# Altium PCB OFP_MCM_v1.62.PcbDoc (part 8 of 8)
Units mil, origin at the board's own origin, x right, y up, seen from the top; angles counter-clockwise.
Board outline 4330.71 x 4724.41 mil, 4 copper layers (Top Layer, Layer 1, Layer 2, Bottom Layer), stack 62.047 mil thick; 385 components, 287 nets, 1341 pads, 554 vias.
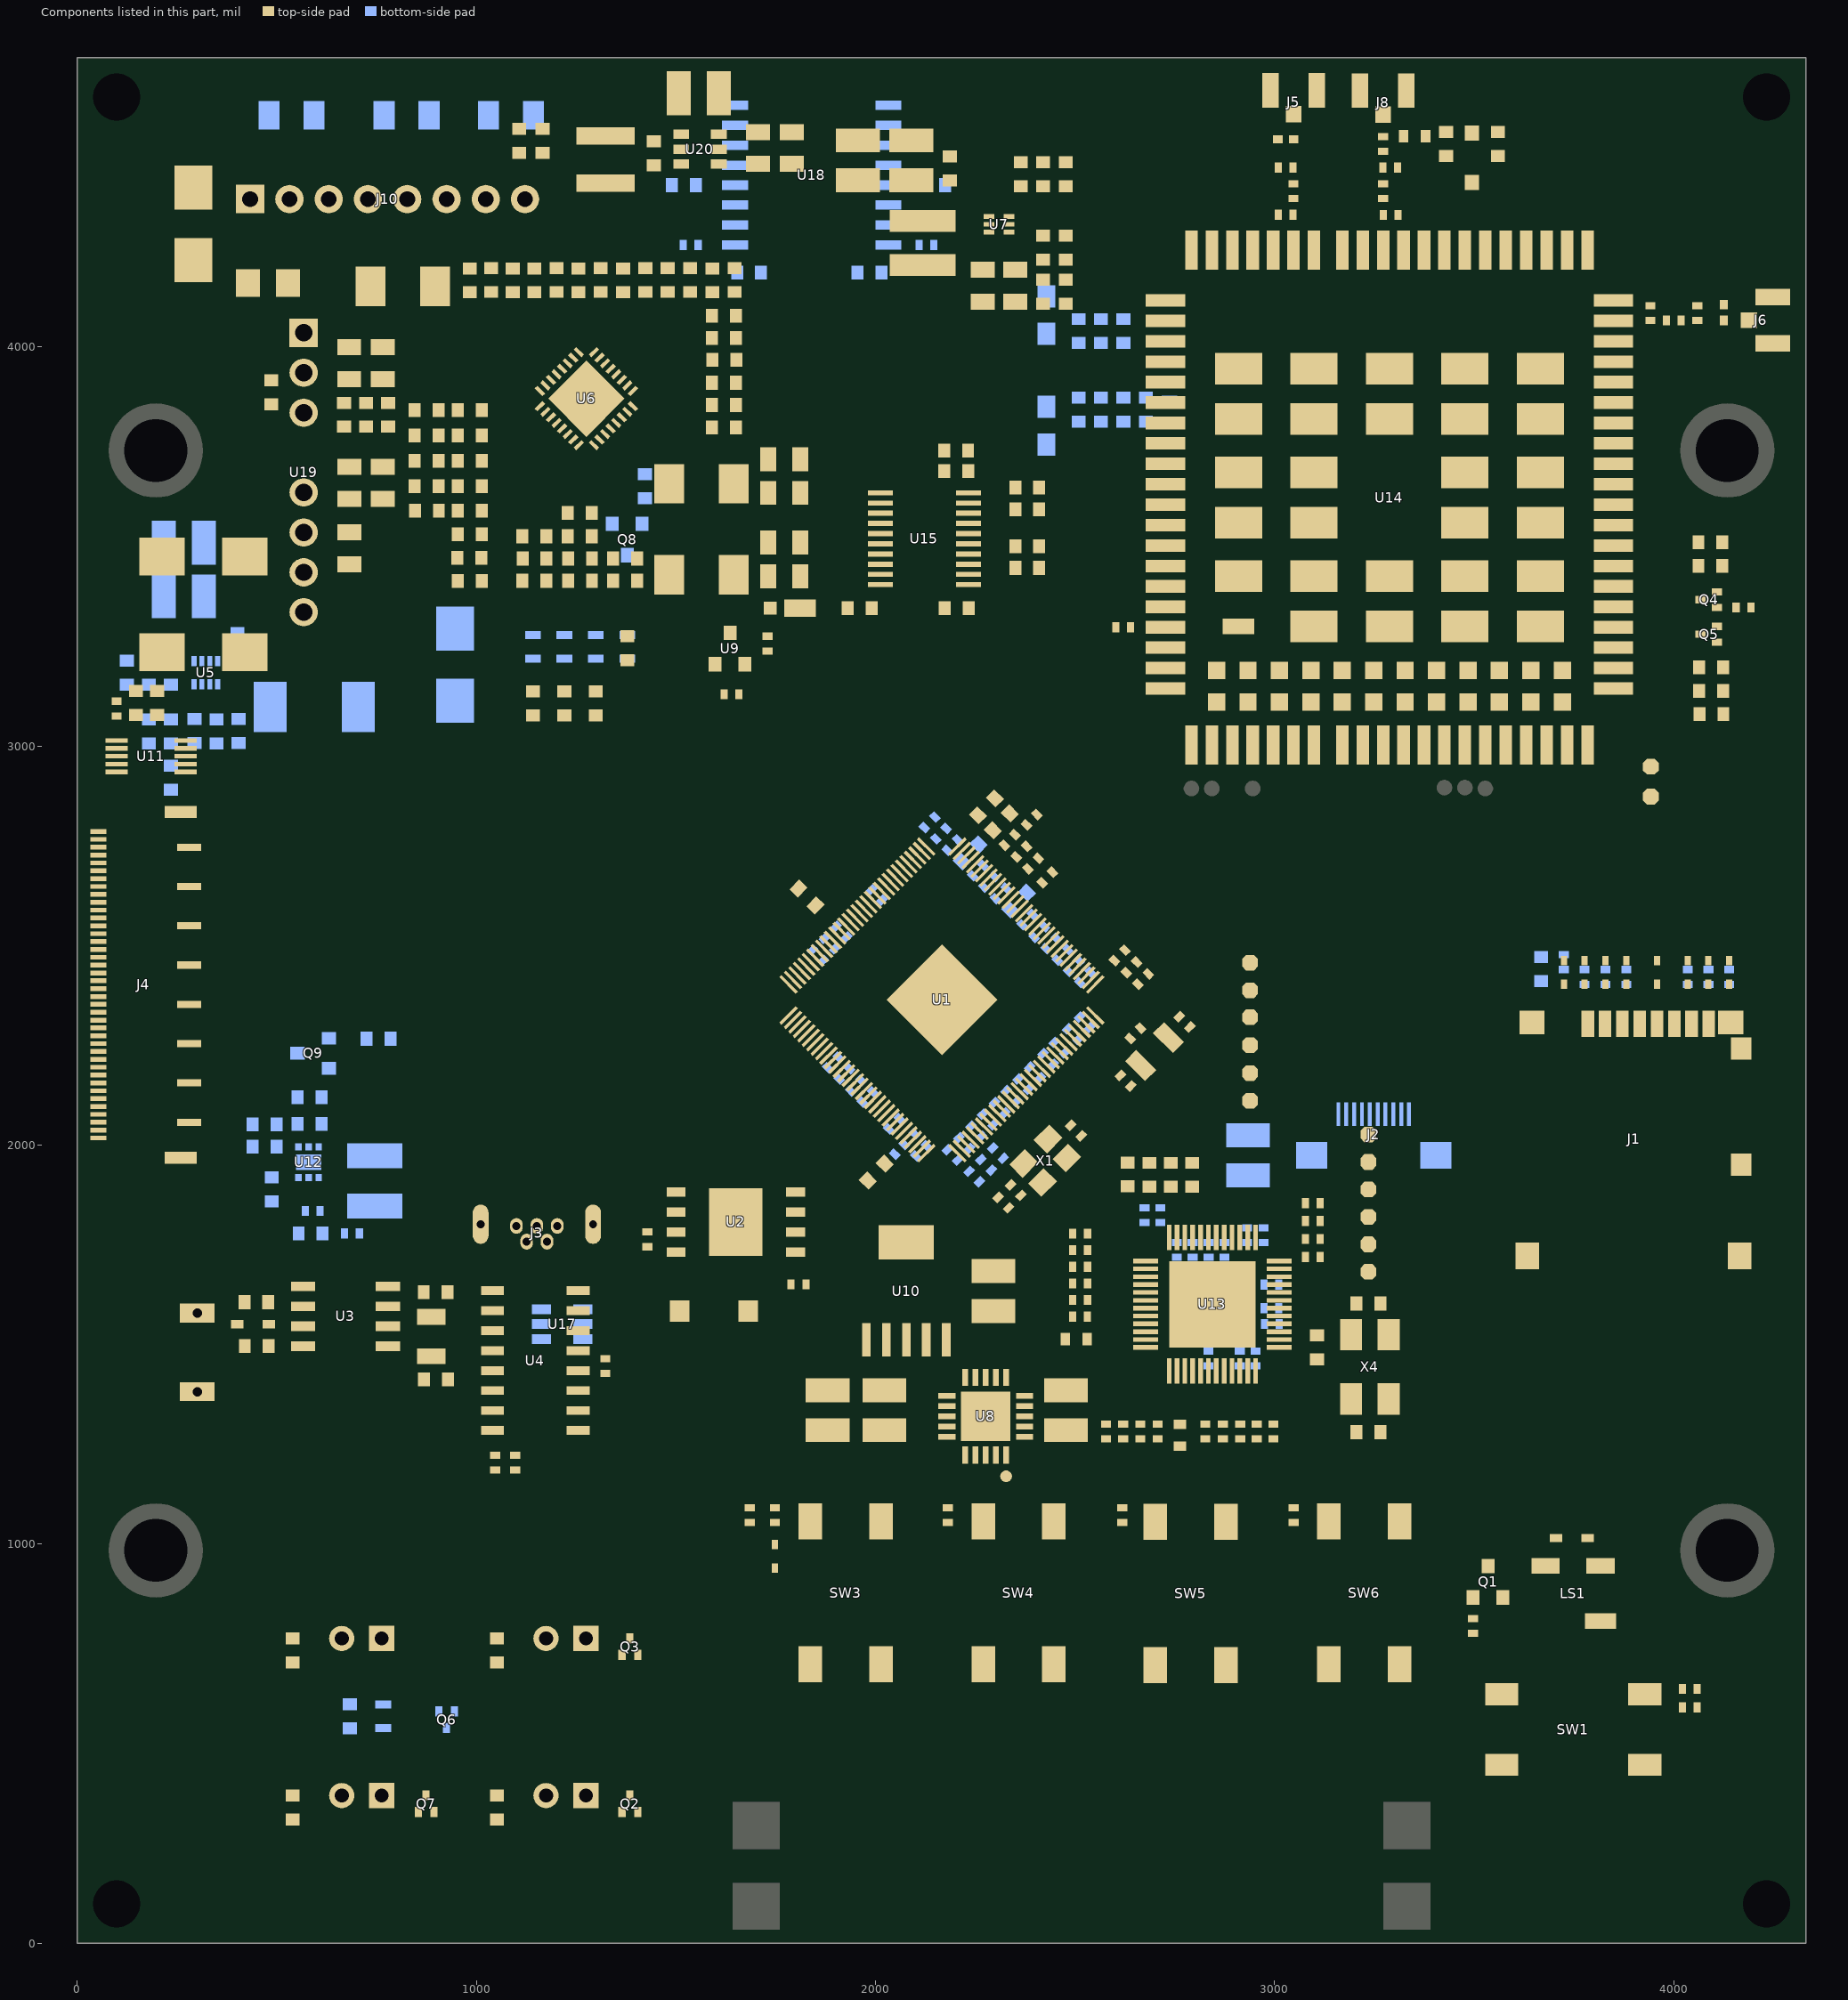
[diagram p7: the components of this part, seen from the top]

## Polygon pours and split planes (outlines as drawn)
+3.8V on Top Layer "NONET_L-01_P-001" (solid, pour order 37): 2218.63,4153.04 2232.95,4138.72 2501.88,4138.72 2515.99,4124.61 2515.99,4043.19 2529.66,4029.53 2783.22,4029.53 2798.91,4013.84 2798.91,3860.24 2783.16,3844.49 2035.39,3844.49 2035.39,4232.53 2218.63,4232.53
GND on Top Layer "NONET_L-01_P-001" (solid, remove dead copper, pour order 45): 0,4724.41 4330.71,4724.41 4330.71,0 0,0 0,4724.41
VCC-DRAM on Top Layer "NONET_L-01_P-001" (solid, pour order 19): 2245.47,2214.59 2287.25,2214.59 2355.62,2146.22 2384.67,2117.17 2301.15,2033.65 2259.39,2075.41 2225.67,2075.41 ccw(c2225.67,1975.41) 2154.96,2046.12 2031.98,1923.14 1993,1962.12
+5V on Top Layer "NONET_L-01_P-001" (solid, pour order 4): 1322.1,3800.51 1397.95,3724.66 1401.53,3724.66 1408.89,3732.02 1408.89,3761.27 1345.88,3824.28
GND on Layer 1 "NONET_L-01_P-001" (solid, pour order 36): 0,4724.41 4330.71,4724.41 4330.71,0 0,0 0,4724.41
+3.3V on Layer 2 "NONET_L-01_P-001" (solid, pour order 32): 1010,259.07 ccw(c1049.06,259.06) 1049.07,220 ccw(c1049.07,259.07) 1088.14,259.07 1088.14,1034.24 3489.29,1034.24 3613,1156.79 3613,2688.65 4310.95,2688.65 4310.95,0 0,0 0,3625.64 2304.54,3625.63 2342.01,3588.16 2342.01,3254.89 2300.12,3213 1520,3213 1490,3183 1490,1992.69 1580.69,1902 1861.8,1902 1873,1890.8 1873,1803.19 1862.61,1792.8 1492.2,1792.8 1341.66,1943.34 1341.66,3061.36 1306.91,3096.12 1136.08,3096.11 1094.99,3055.02 1094.99,2505.21 724.31,2134.53 724.31,1303.1 1010,1017.41
+5V on Layer 2 "NONET_L-01_P-001" (solid, pour order 13): 3227.39,1957.39 3244.27,1957.39 3285,1916.67 3285,1230 3250,1195 2045,1195 2016.17,1223.83 2016.17,1540.47 1991.64,1565 1790,1565 1770,1545 1770,1070.25 3465.25,1070.25 3570.5,1175.5 3570.5,2688.65 2775.59,3483.56 2775.59,4710 15,4710 15,3652.92 450.26,3652.92 565.49,3768.14 565.49,4255.88 551.36,4270 385,4270 360,4295 360,4409.61 385.39,4435 2315,4435 2370,4380 2370,2953.77 2810,2513.77 2810,1986.54 2839.15,1957.39
GND on Layer 2 "NONET_L-01_P-001" (solid, pour order 52): 2115.81,3034.73 cw(c2115.81,3012.22) 2138.32,3012.22 2138.32,2807.44 1933.7,2602.82 1902.18,2602.82 1852.52,2652.49 1811.14,2652.49 1666,2507.35 1666,2358.77 1904.57,2120.21 1864.6,2080.23 1974.29,1970.54 2010.75,1970.54 2024.78,1956.51 2024.78,1889.22 2052.95,1861.05 2343.18,1861.05 2411.68,1929.55 2499.45,1929.55 2516,1913 2515.72,1912.72 2515.72,1377.72 2494.67,1356.67 2367.62,1356.67 2351.69,1340.74 2351.69,1244.6 2327.09,1220 2063.85,1220 2041.41,1242.44 2041.41,1563.59 2012,1593 1777.15,1593 1734,1549.85 1734,1140 1125,1140 891.05,1373.95 891.05,2061.45 1173.59,2344 1251,2344 1251,1920.12 1456.1,1715.02 2303.84,1715.02 ccw(c2303.85,1746.96) 2335.79,1746.97 2335.79,1756.64 ccw(c2299.65,1756.65) 2299.64,1792.8 1905.59,1792.8 1893.7,1804.69 1893.7,1895.39 1863.88,1925.2 1609.61,1925.2 1524.32,2010.5 1524.32,3014.05 1545,3034.73
VCC-IO on Layer 2 "NONET_L-01_P-001" (solid, pour order 43): 2293.24,2499.71 2375.57,2582.04 2392.54,2582.04 2515.08,2459.5 2515.08,2444.01 2199.22,2128.15 2199.22,2027.05 2160.18,1988.01 1982.75,1988.01 1896.04,2074.72 1896.04,2082.3 1920.62,2106.88 1927.93,2106.88 1998.3,2036.5 2138.32,2036.5 2151.31,2049.49 2151.31,2162.51 2446.48,2457.67 2446.48,2471.74 2415.3,2502.92 2392.03,2502.92 2267.3,2378.19 2244.56,2378.19 2007.25,2615.51 2007.25,2646.73 2198.89,2838.38 2204.11,2838.38 2260.08,2782.41 2260.08,2768.58 2138.32,2646.83 2138.32,2633.2 2271.81,2499.71
GND on Layer 2 "NONET_L-01_P-001" (solid, pour order 50): 4330.71,4724.41 2822,4724.41 2822,3496.84 3594.62,2724.22 4330.71,2724.22
GND on Layer 2 "NONET_L-01_P-001" (solid, pour order 51): 2342.01,3688.31 2306.62,3652.92 1504.71,3652.92 1478.43,3679.2 1478.43,4304.57 1448.35,4334.65 1086.77,4334.65 1086.77,4409 2297,4409 2342.01,4363.99
+1.2V on Layer 2 "NONET_L-01_P-001" (solid, pour order 49): 659.04,4273.91 685.13,4300 1425.74,4300 1449.43,4276.3 1449.43,4042.61 1425.77,4018.95 685.31,4018.95 659.04,4045.22
VDD-SYS on Layer 2 "NONET_L-01_P-001" (solid, pour order 48): 2057.6,1970 2045.4,1957.8 2045.4,1892.93 2058.33,1880 2331.01,1880 2355.94,1904.93 2355.94,2081.61 2445.34,2171 2445.34,2188.8 2370.71,2263.42 2355.97,2263.42 2215.92,2123.37 2215.92,2020.11 2165.81,1970
AVCC on Layer 2 "NONET_L-01_P-001" (solid, pour order 47): 2476.19,2161.19 2476.19,2181.64 2388.67,2269.15 2388.67,2285.39 2530.5,2427.23 2530.5,2466 2490.56,2505.94 2398.5,2598 2369.92,2598 2286.93,2515 2278.14,2515 2263.17,2529.97 2263.17,2538.16 2392.21,2667.2 2417.8,2667.2 2635.95,2449.05 2635.95,2353.47 2635.95,2098.09 2487.01,1949.14 2458.07,1949.14 2371.44,2035.77 2371.44,2056.44
VDD-SYS on Layer 2 "NONET_L-01_P-001" (solid, pour order 44): 1816.08,2455.57 1965.89,2605.37 1993.28,2605.37 2232.81,2365.84 2277.8,2365.84 2398.34,2486.38 2410.12,2486.38 2427.38,2469.13 2427.38,2460.86 2135.55,2169.03 2135.55,2086.71 2129.98,2081.14 2106.88,2081.14 2101.44,2086.58 2101.44,2142.85 1816.08,2428.21
VCC-HP on Layer 2 "NONET_L-01_P-001" (solid, pour order 46): 2651.57,2367.26 2651.57,2116.01 2670.8,2096.78 2752.88,2096.78 2772.64,2116.54 2772.64,2496.16 2454.44,2814.36 2420.66,2814.36 2209.28,2602.98 2209.28,2583.65 2238.18,2554.75 2257.14,2554.75 2385.9,2683.51 2423.36,2683.51 2651.57,2455.3
VDD-CPU on Layer 2 "NONET_L-01_P-001" (solid, pour order 42): 1842.95,2636.37 1900,2579.33 1900,2563.7 1799.22,2462.92 1799.22,2420.26 2040,2179.48 2040,2159.28 1976.98,2096.25 1961.29,2096.25 1687.5,2370.05 1687.5,2500.71 1823.16,2636.37
+5V on Layer 2 "NONET_L-01_P-001" (solid, pour order 27): 420,4256.19 433.8,4270 551.36,4270 566.93,4254.44 566.93,4004.77 581.7,3990 1425.84,3990 1449.43,3966.4 1449.43,3677.39 1424.96,3652.92 450.26,3652.92 420,3683.18
VDD33 on Layer 2 "NONET_L-01_P-001" (solid, pour order 33): 2535,1913.8 2549.2,1928 3230.84,1928 3253.5,1905.33 3253.5,1253.5 3220,1220 2678.75,1220 2653,1245.75 2653,1408.08 2636.08,1425 2552.48,1425 2534.99,1442.49 2534.99,1515.76 2551.39,1532.16 2856.78,1532.16 2882.68,1506.26 2882.68,1318.48 2897.59,1303.58 2969.21,1303.58 2985.36,1319.73 2985.36,1459.91 3000.1,1474.65 3108.38,1474.65 3127.12,1493.39 3127.12,1692.2 3111.55,1707.78 3053.91,1707.78 3036.87,1724.82 3036.87,1784.62 3013.49,1808 2657.57,1808 2640.18,1790.61 2640.18,1738.91 2623.03,1721.76 2545.77,1721.76 2534.99,1732.53
VDD11 on Layer 2 "NONET_L-01_P-001" (solid, pour order 41): 2534.99,1693.71 2546.6,1705.97 2629.21,1705.97 2655.7,1732.46 2655.7,1784.22 2663.78,1792.31 3006.69,1792.31 3021.26,1777.74 3021.26,1710.96 3040.02,1692.2 3101.67,1692.2 3111.64,1682.24 3111.64,1499.54 3102.2,1490.11 2993.88,1490.11 2970.03,1466.26 2970.03,1326.53 2962.47,1318.97 2905.03,1318.97 2897.98,1326.02 2897.98,1512.77 2859.08,1551.67 2549.16,1551.67 2534.99,1565.84
NetL6_2 on Bottom Layer "NONET_L-01_P-001" (solid, pour order 38): 814.01,1937.92 624.77,1937.92 624.77,1986.77 597.51,1986.77 597.51,2016.92 814.01,2016.92
+3.3V on Bottom Layer "NONET_L-01_P-001" (solid, pour order 53): 1877.89,2208.85 1831.6,2162.56 ccw(c1893.61,2100.55) 1805.92,2100.55 1805.92,1646.08 ccw(c1837,1646.08) 1837,1615 1990.71,1615 ccw(c1990.71,1661.34) 2037.05,1661.34 2037.05,1948.55 ccw(c2015.05,1948.55) 2015.05,1970.54 1991.09,1970.54 ccw(c1991.09,1945.45) 1966,1945.45 1966,1872.31 cw(c1943.72,1872.31) 1943.72,1850.04 1878.1,1850.04 cw(c1878.1,1875.13) 1853,1875.14 1853,2077.83 cw(c1886.25,2077.84) 1862.74,2101.35 1924.06,2162.67
GND on Bottom Layer "NONET_L-01_P-001" (solid, remove dead copper, pour order 5): 0,4724.41 4330.71,4724.41 4330.71,0 0,0 0,4724.41
+5V on Bottom Layer "NONET_L-01_P-001" (solid, pour order 40): 2763.36,1988.36 2751,2000.72 2751,2122.69 2760.31,2132 3153.51,2132 3164.34,2121.17 3164.34,2037.64 3152.86,2026.16 3023.77,2026.16 2985.97,1988.36

## Other copper
Top Layer:
  rectangle net NetD20_1: 3689,925.79 3720.49,1025.59
  rectangle net +3.3V: 3767.74,925.79 3799.23,1025.59
  rectangle net GND: 32.95,2405.41 72.95,2437.1
  rectangle net GND: 32.95,2247.93 72.95,2279.62
  rectangle net GND: 32.95,2090.45 72.95,2122.14
  rectangle net 12V: 155.65,3427.62 477.09,3562.38
  rectangle net +5VUSB: 1011.53,1213.95 1117.99,1300.63
  region net +3.3V: 433.77,1540.7 433.77,1561.18 385.15,1561.18 385.15,1540.7
  rectangle net 3V3-I: 1576.91,4388.02 1832.26,4469.41
  rectangle net 3V3-I: 1653.35,4388.02 1832.26,4498
  rectangle net 3V3-I: 1250.61,4388.02 1820,4431.33
  rectangle net GND-IN: 1476.91,4520.59 1536.91,4690
  rectangle net NetC151_2: 1250.61,4483.19 1462.24,4549.44
  rectangle net NetC151_1: 1433.24,4440 1532.44,4470
  rectangle net NetC151_2: 1250.61,4483.19 1532.44,4506.81
  rectangle net 3V3-I: 1576.91,4445.79 1790,4469.41
  rectangle net VIN+: 1576.91,4483.19 1636.91,4635
  rectangle net GND: 1581.97,3116.79 1629.55,3222.88
  rectangle net VLED-: 32.95,1955 166.15,2023.72
  rectangle net GND: 1583.25,1630.52 1717.11,1891.74
  rectangle net GND: 2813.44,1255.08 2840.27,1273.08
  region net GND: 1328.76,3768.19 1335.72,3775.15 1281.67,3829.2 1274.71,3822.24
  region net GND: 1370.52,3809.95 1377.48,3816.91 1323.43,3870.96 1316.47,3864
  region net GND: 1349.64,3951.09 1342.68,3958.05 1288.63,3904 1295.59,3897.04
  region net GND: 1222.42,3971.97 1215.46,3965.01 1269.51,3910.96 1276.47,3917.92
  rectangle net NetR63_2: 2320.93,4320.52 2437.03,4416.94
  rectangle net 1.1V-HUB: 2422,1255.58 2532,1335.58
  rectangle net +3.3V: 1619.37,3265.4 1742.1,3301.62
  rectangle net +3.0V: 1648.55,3076.3 1689.05,3222.88
  rectangle net +3.8V: 2677.16,3844.49 2775.59,4029.53
  region net USB-D_N: 2408.33,2544.48 2448.7,2584.85 2443.14,2590.41 2402.77,2550.04
  region net USB-D_P: 2397.2,2555.61 2437.57,2595.98 2432,2601.55 2391.63,2561.18
  rectangle net 1.1V-HUB: 2319.92,1396.21 2394.49,1439
  rectangle net 1.1V-HUB: 2422,1255.58 2589.64,1273.08
  rectangle net 1.1V-HUB: 2351.69,1312.19 2532,1335.58
  rectangle net 1.1V-HUB: 2351.69,1313.26 2394.49,1439
  rectangle net +3.8V: 2035.39,4093.04 2493.76,4138.72
  rectangle net +3.8V: 2035.39,4093.04 2218.63,4232.53
  rectangle net NetR58_1: 2320.93,4263.09 2437.03,4292.96
  region net VCC-DRAM: 2326.68,2176.09 2320.07,2169.47 2378.52,2111.02 2385.14,2117.64
  region net VCC-DRAM: 2247.95,2098.92 2241.33,2092.3 2300.57,2033.07 2307.19,2039.69
  region net AGND: 2354.58,2623.4 2347.97,2630.01 2314.5,2596.55 2321.12,2589.93
  region net AGND: 2448.55,2665.06 2488.02,2704.53 2373.27,2819.28 2333.8,2779.81
  region net VDD-CPU: 1805.13,2507.41 1866.89,2445.65 1883.61,2462.37 1821.85,2524.13
  region net VDD-CPU: 1874.32,2549.57 1899.57,2574.81 1860.39,2613.99 1835.14,2588.74
  region net VDD-CPU: 1825.97,2597.92 1922.56,2501.32 1939.28,2518.04 1842.69,2614.63
  region net VCC-DRAM: 2031.98,1923.14 2128.57,2019.73 2089.59,2058.71 1993,1962.12
  region net VCC-DRAM: 2284.45,2016.95 2242.7,2058.71 2178.26,1994.27 2220.02,1952.52
  region net VCC-DRAM: 2277.47,2022.93 2264.78,2035.62 2181.97,1952.81 2194.66,1940.12
  rectangle net VDD11: 2813.44,1292.08 2840.27,1310.08
  rectangle net NetR110_2: 4048.54,3062.5 4079,3155.3
  rectangle net EC_RST: 4048.54,3179.35 4079.68,3310.43
  rectangle net EC_PWR: 4046.5,3335.51 4079.68,3527.6
  rectangle net VDD33: 2979.61,1703.41 3085.51,1715.22
  rectangle net +5V: 2260.42,4320.52 2307.17,4342.24
  region net +5V: 1345.88,3824.28 1322.1,3800.51 1383.98,3738.63 1407.76,3762.4
  region net NetC65_2: 1304.12,3782.52 1293.71,3772.12 1359.19,3706.64 1369.59,3717.04
  region net NetC72_2: 1373.71,3852.12 1363.31,3841.71 1428.72,3776.3 1439.13,3786.71
  region net NetC54_2: 1248.86,3959.44 1255.82,3966.4 1201.77,4020.45 1194.81,4013.49
  region net +3.3V: 83.4,3092.5 ccw(c83.4,3080) 70.9,3080 70.9,3007.66 203.4,3007.66 ccw(c203.4,3021.51) 217.24,3021.51 217.24,3092.5
  region net 12V: 567.18,3570.29 cw(c567.18,3534.86) 602.62,3534.86 cw(c567.18,3534.86) 567.18,3499.43 155.65,3499.43 155.65,3570.29
  region net VIN+: 566.93,4405.51 566.93,4285.56 cw(c551.36,4285.56) 551.36,4270 468.5,4270 468.5,3999 ccw(c497.81,3999) 497.81,3969.69 567.18,3969.69 cw(c566.75,3933.81) 602.62,3934.86 cw(c567.18,3934.86) 567.18,3899.43 194,3899.43 194,4225 cw(c241.63,4225) 241.63,4272.63 360.44,4272.63 ccw(c360.44,4310) 397.81,4310 397.81,4405.51
  region net +EXT: 4102.03,3214.35 ccw(c4102.03,3207.74) 4095.41,3207.74 4095.41,3129.76 ccw(c4104.88,3129.76) 4104.88,3120.3 4151.05,3120.3 cw(c4151.06,3098.9) 4172.45,3098.9 4172.45,3097.5 4192.39,3097.5 4192.39,3191.77 ccw(c4169.81,3191.78) 4169.81,3214.35
  region net 3.3V-HUB: 2101.62,1442.62 ccw(c2101.62,1457) 2116,1457 2116,1598 2116,1599.58 2116.61,1602.67 2117.82,1605.58 2119.57,1608.2 2121.8,1610.43 2124.42,1612.18 2127.33,1613.39 2130.42,1614 2132,1614 2357.03,1614 2358.17,1614 2360.42,1613.55 2362.53,1612.68 2364.43,1611.41 2366.05,1609.79 2367.32,1607.89 2368.2,1605.77 2368.64,1603.53 2368.64,1602.38 2368.64,1548.94 2368.7,1547.83 2369.13,1545.64 2369.98,1543.59 2371.22,1541.74 2372.8,1540.16 2374.65,1538.93 2376.7,1538.07 2378.89,1537.64 2380,1537.58 2478.88,1537.58 2479.68,1537.58 2481.23,1537.27 2482.7,1536.67 2484.02,1535.78 2485.14,1534.66 2486.03,1533.34 2486.63,1531.87 2486.94,1530.32 2486.94,1529.52 2486.94,1478 2486.94,1477.18 2486.62,1475.56 2485.99,1474.03 2485.08,1472.66 2483.91,1471.5 2482.54,1470.58 2481.01,1469.95 2479.4,1469.63 2478.57,1469.63 2243.15,1469.63 2242.05,1469.58 2239.89,1469.15 2237.85,1468.3 2236.01,1467.07 2234.45,1465.51 2233.22,1463.68 2232.38,1461.64 2231.95,1459.47 2231.9,1458.37 2231.9,1396.21 2213.9,1396.21 2212.55,1396.14 2209.9,1395.61 2207.4,1394.58 2205.16,1393.08 2204.51,1392.43 2203.9,1392.43 2203.9,1391.82 2203.25,1391.17 2201.74,1388.92 2200.71,1386.42 2200.18,1383.77 2200.12,1382.42 2200.12,1313.26 2148,1313.26 2147.22,1313.22 2145.68,1312.91 2144.23,1312.31 2142.92,1311.44 2141.82,1310.33 2140.94,1309.03 2140.34,1307.58 2140.04,1306.04 2140,1305.26 2140,1285.58 2140.04,1284.68 2140.39,1282.92 2141.08,1281.26 2142.08,1279.76 2143.35,1278.49 2144.85,1277.49 2146.51,1276.8 2148.27,1276.45 2149.17,1276.41 2200.12,1276.41 2200.12,1255.58 2200.17,1254.51 2200.59,1252.4 2201.41,1250.42 2202.6,1248.63 2204.12,1247.12 2205.9,1245.92 2207.89,1245.1 2209.99,1244.68 2211.07,1244.63 2231.9,1244.63 2231.9,1201.84 2103,1201.84 2101.72,1201.84 2099.21,1202.34 2096.84,1203.32 2094.71,1204.74 2092.9,1206.55 2091.48,1208.68 2090.5,1211.04 2090,1213.56 2090,1214.84 2090,1338.85 2089.92,1340.49 2089.28,1343.71 2088.02,1346.74 2086.2,1349.46 2083.88,1351.78 2081.16,1353.6 2078.13,1354.86 2074.91,1355.5 2073.27,1355.58 1967,1355.58 1967,1442.62
  pour cut-out: 651.73,3623.66 651.73,3570.29 15.29,3570.29 15.29,3901.18 605.9,3901.18 605.9,3971.49 651.73,3971.49
  pour cut-out: 2667.16,3664.5 2667.16,3674.5 2195.17,3674.5 2195.17,3664.5
  pour cut-out: 847.01,3968.75 847.01,4259.95 612.54,4259.95 612.54,3968.75
  pour cut-out: 953.04,1702.23 953.04,1429.96 914.04,1429.96 914.04,1362.82 737.84,1362.82 737.84,1625.02 808.87,1625.02 808.87,1702.23
  pour cut-out: 247.47,1468.62 606.27,1468.62 606.27,1588.58 247.47,1588.58
  pour cut-out: 1216.07,1312.82 1293.62,1312.82 1293.62,1655.82 1216.07,1655.82
  pour cut-out: 1001.53,1312.82 1079.07,1312.82 1079.07,1655.82 1001.53,1655.82
  pour cut-out: 1393.24,1763.09 1466.97,1763.09 1466.97,1765.87 1393.24,1765.87
  pour cut-out: 1879.7,4386.94 1900.7,4386.94 1900.7,4709.12 1879.7,4709.12
  pour cut-out: 970.79,3736.67 978.38,3736.67 978.38,3754.69 970.79,3754.69
  region net GND-IN: 117 vertices and 6 holes, not listed, extent 15.29,3899.43 1832.26,4709.12
  region net GND-IN: 504.57,4259.33 600.31,4259.33 601.86,4259.17 602.62,4252.49 602.62,3972.83 596.15,3970.15 595.08,3971.22 584.72,3977.2 573.16,3980.29 561.2,3980.29 559.67,3979.88 498.06,3979.88 496.19,3979.97 492.28,3980.75 488.82,3982.18 485.72,3984.26 483.07,3986.9 481,3990.01 479.57,3993.46 478.79,3997.38 478.7,3999.25 478.7,4230.75 479.11,4233.87 478.92,4234.1 480.83,4243.7 486.4,4252.03 494.74,4257.6 503.87,4259.42
  region net +5V: 2478.37,4609.72 2479.55,4608.93 2492.69,4595.79 2493.48,4594.61 2493.76,4593.22 2493.76,4448.44 2493.5,4447.11 2493.23,4446.94 2458.76,4446.94 2458.76,4515.45 2446.8,4527.41 2321.33,4527.41 2310.86,4516.94 2310.86,4417.58 2310.74,4416.94 2310.74,4320.52 2307.07,4320.52 2256.16,4320.52 2256.16,4386.94 2018.7,4386.94 2013.1,4386.94 1900.7,4386.94 1900.7,4446.94 2141.24,4446.94 2144.75,4446.94 2221.89,4446.94 2221.89,4458.81 2221.89,4588.62 2222.16,4590.02 2222.95,4591.2 2240.69,4608.93 2241.87,4609.72 2243.26,4610 2476.98,4610
  region net +1.2V: 805.28,4228.35 805.28,3978.95 651.73,3978.95 651.73,4228.35
  region net +5V: 650.92,3659.91 650.92,3814.58 816.5,3814.58 816.5,3975.95 878.36,3975.95 878.56,3975.91 1190.64,3975.91 1227.98,3938.56 1207.22,3917.8 1180.66,3944.35 1171.76,3953.25 1042.72,3953.25 1038.54,3949.07 964.06,3874.58 872.2,3874.58 872.2,3572.05 827.88,3572.05 827.88,3652.42 820.39,3659.91
  pour cut-out: 1747.84,4260 1064.72,4260 1064.72,4150.92 1747.84,4150.92
  pour cut-out: 1900.7,4386.94 1879.7,4386.94 1879.7,4260 1748,4260 1748,4232.53 1900.7,4232.53
  pour cut-out: 3907.96,3220.63 3907.96,3271.5 3897.07,3271.5 3897.07,3220.63
  pour cut-out: 2607.64,1278.46 3019.09,1278.46 3019.09,1292 2607.64,1292
  pour cut-out: 3264.37,2041 3259.53,2041 3259.53,1736.25 3264.37,1736.25
  pour cut-out: 3244.53,1460.54 3249.92,1460.54 3249.92,1652.33 3244.53,1652.33
  pour cut-out: 865.58,3629.29 865.58,3622.79 883.6,3622.79 883.6,3629.29
  pour cut-out: 2769.57,1920.22 2769.57,2030.08 2765.68,2030.08 2765.68,1920.22
  pour cut-out: 3706.45,2336.42 3706.45,2424.35 3801.8,2424.35 3801.8,2564.22 4112.27,2564.22 4112.27,2336.42
  region net +5V: 2047.55,1552.71 2050.44,1549.82 2052,1546.04 2052,1544 2052,1471.17 2052,1468.35 2049.84,1463.14 2045.86,1459.16 2040.65,1457 1955.58,1457 1953.52,1456.8 1949.7,1455.22 1946.78,1452.3 1945.2,1448.48 1945,1446.42 1945,1365.58 1945,1363.59 1943.48,1359.92 1940.66,1357.1 1936.99,1355.58 1825.15,1355.58 1819.12,1358.08 1814.5,1362.7 1812,1368.73 1812,1372 1812,1537.06 1812,1540.49 1814.62,1546.81 1819.46,1551.66 1825.79,1554.28 2043.77,1554.28
  region net NetC54_2: 955.74,4228.35 955.74,4151.36 1000.83,4151.36 1001.1,4151.08 1001.1,4040.61 1181.61,4040.61 1229.27,3992.96 1229.15,3992.85 1255.71,3966.29 1249.11,3959.69 1229.63,3979.18 1228.79,3979.74 1222.42,3986.11 1222.31,3986 1222.07,3986.24 1208.93,3973.1 1195.94,3986.1 847.01,3986.1 847.01,4228.35
  region net +3.3V: 1751.75,3576.97 1751.75,3274.75 1737.4,3260.4 1607.05,3260.4 1607.05,3576.97
  region net +1.8V: 1751,3747.74 1751,3587.96 1607.05,3587.96 1607.05,3765.12 1733.62,3765.12
  region net NetC65_2: 1321.55,3760.98 1322.39,3760.42 1328.76,3754.05 1330.68,3755.96 1330.81,3755.82 1341.46,3766.47 1408.42,3699.51 1408.42,3606.32 1437.77,3576.97 1543.31,3576.97 1543.31,3366.55 1536.75,3360 1330.59,3360 1322.63,3367.95 1322.63,3426.07 1327.64,3431.08 1366.67,3431.08 1372.64,3425.11 1372.64,3386.08 1377.22,3381.49 1423.34,3381.49 1427.64,3385.79 1427.64,3386.08 1427.64,3441.08 1427.64,3497.73 1417.64,3507.73 1372.64,3507.73 1356.8,3523.57 1356.8,3712.31 1321.91,3747.2 1322.02,3747.31 1295.47,3773.87 1302.06,3780.47
  region net NetC72_2: 1398.36,3823.65 1398.47,3823.76 1406.71,3815.52 1530.78,3815.52 1530.91,3815.65 1609.92,3815.65 1609.92,3780.65 1550.01,3780.65 1542.66,3773.95 1542.66,3587.95 1442.62,3587.95 1419,3611.57 1419,3789.3 1391.51,3816.8 1391.62,3816.91 1385.25,3823.28 1384.69,3824.12 1365.2,3843.61 1371.8,3850.2
Layer 1:
  pour cut-out: 626.67,3744.23 507.26,3744.23 507.26,4117.93 626.67,4117.93
  pour cut-out: 364.14,4310.6 364.14,4430 1180,4430 1180,4310.6
Bottom Layer:
  rectangle net GND: 571.92,1962.35 586.74,2027.45
  rectangle net +5V: 534.72,1712 794.11,1749
  region net 12V: 325.83,3306.87 325.83,3199.1 338.43,3199.1 338.43,3306.87
  rectangle net +5V: 698.01,1712 794.01,1878.5
  rectangle net NetL6_2: 629.74,1941.5 794.01,2004.49
  rectangle net NetL6_2: 597.51,1986.77 794.01,2004.49
  rectangle net GND: 614.74,1766.09 679.01,1791.09
  region net NetR82_1: 629.74,1817.42 629.74,1927.71 594.72,1927.71 594.72,1817.42
  region net +5V: 587.67,1867.5 587.67,1927.71 569.27,1927.71 569.27,1867.5
  region net +5V: 587.67,1712 587.67,1901.35 534.72,1901.35 534.72,1712
  region net +5V: 586.94,1761.06 586.94,1927.71 571.92,1927.71 571.92,1761.06
  region net VLED-: 454.14,1978.75 454.14,2069.49 424.14,2069.49 424.14,1978.75
  rectangle net GND: 3311.98,2020 3341.5,2106.6
  rectangle net GND: 2491.12,3797.52 2638.48,3827.52
  rectangle net GND: 2491.12,4054.37 2638.48,4084.37
  rectangle net +3.8V: 2405.47,3838.52 2694.66,4039.37
  rectangle net VDD33: 3001.11,1539.34 3019.89,1603.71
  rectangle net +USIM: 3211.58,2047.55 3245.23,2146.73
  rectangle net +3.3V: 3650.08,2456.18 3736.82,2486.21
  region net 12V: 419,3469.47 cw(c448.95,3469.47) 448.95,3499.43 567.18,3499.43 ccw(c567.18,3534.86) 602.62,3534.86 ccw(c567.18,3534.86) 567.18,3570.29 287.13,3570.29 287.13,3268.03 302.34,3268.03 cw(c302.34,3244.55) 325.83,3244.55 325.83,3199.1 338.43,3199.1 338.43,3224.65 cw(c366.81,3224.65) 366.81,3253.03 419,3253.03
  region net +1.8V: 1669.29,3632.95 1669.29,3727.05 cw(c1682.24,3727.05) 1682.24,3740 1761.17,3740 cw(c1761.17,3725.54) 1775.63,3725.54 1775.63,3590.86 1740.66,3590.86 ccw(c1712.9,3592.24) 1714.28,3620 1682.24,3620 cw(c1682.24,3632.95)
  region net +5V: 786.98,3793.02 874.45,3793.02 874.45,3208 953.79,3208 957.71,3208 965.41,3206.47 972.65,3203.47 979.18,3199.11 984.73,3193.56 989.08,3187.04 992.09,3179.79 993.11,3174.62 993.61,3168.18 993.61,3066.35 993.61,3029.99 902.55,3029.99 902.55,3030.05 891.86,3028.64 881.9,3024.51 873.35,3017.95 866.78,3009.39 863.77,3002.12 856.19,3002.12 854.49,3006.23 848.35,3012.37 840.34,3015.69 831.66,3015.69 830.81,3018.42 830.81,3019.34 827.49,3027.35 821.35,3033.49 813.34,3036.81 804.66,3036.81 796.65,3033.49 790.51,3027.35 787.19,3019.34 787.19,3010.66 790.51,3002.65 795.24,2997.92 795.24,2840 670.77,2840 665.06,2845.71 657.05,2849.03 648.37,2849.03 646.28,2848.16 639.28,2852.13 635.96,2860.15 629.82,2866.29 621.8,2869.61 613.13,2869.61 605.11,2866.29 602.99,2864.16 595.99,2867.06 595.99,2896.42 600.71,2901.15 604.03,2909.17 604.03,2917.84 600.71,2925.86 594.58,2932 586.56,2935.32 577.88,2935.32 575.79,2934.45 568.79,2938.5 565.47,2946.51 559.33,2952.65 551.31,2955.97 542.64,2955.97 534.62,2952.65 528.49,2946.51 525.17,2938.5 525.17,2929.82 528.49,2921.8 533.21,2917.08 533.21,2840 338.72,2840 295.93,2840 150,2840 144.95,2839.75 135.04,2837.78 125.7,2833.91 117.3,2828.3 110.15,2821.16 104.54,2812.75 100.67,2803.42 98.7,2793.51 98.46,2788.46 98.46,2595.28 93.9,2595.28 85.88,2591.96 79.75,2585.83 76.43,2577.81 76.43,2569.13 79.75,2561.12 84.47,2556.39 84.47,2346.76 84.42,2346.76 85.7,2337.03 89.45,2327.97 95.42,2320.19 98.46,2317.86 98.46,1861.54 98.69,1856.77 100.55,1847.4 104.21,1838.57 109.52,1830.63 116.27,1823.88 124.21,1818.57 133.04,1814.92 142.41,1813.05 147.18,1812.82 544.67,1812.82 552.66,1809.51 558.77,1803.4 562.08,1795.41 562.08,1736.66 561.03,1731.38 558.97,1726.4 555.97,1721.92 552.16,1718.11 547.68,1715.11 542.7,1713.05 537.42,1712 15.29,1712 15.29,2920 435.39,2920 435.39,3015 648.37,3015 648.37,3793.02 732.33,3793.02
  pour cut-out: 3701.7,2458.72 3701.7,2342.31 4209.29,2342.31 4209.29,2458.7
  pour cut-out: 1786,4708.66 1786,4158.51 1940,4158.51 1940,4708.66
  pour cut-out: 276.46,3198.1 152.01,3198.1 152.01,3168.36 276.46,3168.36
  pour cut-out: 869.16,436.36 869.16,521.36 864.41,521.36 864.41,436.36
  pour cut-out: 1572.74,3077.4 1572.74,3162.4 1570,3162.4 1570,3077.4
  pour cut-out: 1700,3895 1700,3980 1670.13,3980 1670.13,3895
  pour cut-out: 624.05,3720.93 624.05,3964.63 614.27,3964.63 614.27,3720.93
  region net GND-IN: 1363.29,4500.73 1371.15,4494.7 1380.3,4490.91 1390.12,4489.62 1390.12,4489.65 1604.42,4489.65 1605.59,4483.13 1605.59,4477.24 1604.42,4470.24 1365.15,4470.24 1365.15,4470.26 1361.6,4470.97 1358.59,4472.98 1356.58,4475.99 1355.87,4479.54 1355.85,4479.54 1355.85,4498.93 1362.85,4501.31
  region net GND-IN: 275 vertices and 8 holes, not listed, extent 15.29,3731.13 1786,4709.12
  region net 3.3V-HUB: 2886.6,1699.95 2885.67,1698.75 2881.38,1688.39 2879.92,1677.28 2879.99,1677.28 2879.99,1573.22 2879.93,1573.22 2879.92,1573.19 2875.89,1571.52 2859.89,1571.52 2856,1577.34 2856.01,1586.05 2852.69,1594.06 2846.56,1600.2 2838.54,1603.52 2829.87,1603.52 2821.85,1600.2 2818.66,1597.01 2814.08,1594.84 2809.51,1597.01 2806.31,1600.2 2798.3,1603.52 2789.62,1603.52 2781.61,1600.2 2778.41,1597.01 2773.84,1594.84 2769.26,1597.01 2766.07,1600.2 2758.05,1603.52 2749.38,1603.52 2741.36,1600.2 2735.23,1594.06 2731.9,1586.05 2731.9,1577.37 2728.03,1571.52 2625.29,1571.52 2622.35,1574.46 2614.34,1577.78 2605.66,1577.78 2597.65,1574.46 2594.71,1571.52 2581.63,1571.52 2580.09,1573.06 2572.07,1576.38 2563.4,1576.38 2555.38,1573.06 2549.24,1566.93 2549.17,1566.75 2546.41,1563.99 2543.88,1557.88 2543.55,1554.57 2543.55,1472.55 2543.55,1470.45 2541.95,1466.57 2538.98,1463.61 2535.1,1462 2533,1462 2407.11,1462 2404.31,1463.16 2402.16,1465.31 2401,1468.11 2401,1626 2401,1630.97 2404.81,1640.16 2411.84,1647.19 2421.03,1651 2426,1651 2549.09,1651 2549.24,1650.62 2555.38,1644.49 2563.4,1641.17 2572.07,1641.17 2580.09,1644.49 2586.22,1650.62 2586.38,1651 2729.93,1651 2732.27,1651.23 2736.59,1653.02 2739.89,1656.32 2741.68,1660.64 2741.91,1662.98 2741.91,1727.38 2771.81,1727.38 2771.81,1697.25 2771.37,1696.19 2771.37,1687.52 2771.81,1686.46 2771.81,1680.21 2771.92,1679.07 2772.8,1676.96 2774.41,1675.34 2774.55,1675.28 2776.57,1669.64 2776.58,1667.42 2774.69,1665.53 2771.37,1657.51 2771.37,1648.83 2774.69,1640.82 2780.83,1634.68 2788.84,1631.36 2797.52,1631.36 2805.54,1634.68 2808.73,1637.88 2813.3,1640.04 2817.88,1637.88 2821.07,1634.68 2829.09,1631.36 2837.76,1631.36 2845.78,1634.68 2851.92,1640.82 2855.24,1648.83 2855.24,1657.51 2851.92,1665.53 2849.98,1667.46 2849.97,1667.82 2850.38,1670.3 2852.34,1675.01 2853.59,1675.53 2855.52,1677.46 2856.57,1679.98 2856.7,1681.35 2856.7,1727.38 2886.6,1727.38 hole: 2572.07,1632.7 2563.4,1632.7 2555.38,1629.38 2549.24,1623.25 2545.92,1615.23 2545.92,1606.56 2549.24,1598.54 2555.38,1592.4 2563.4,1589.08 2572.07,1589.08 2580.09,1592.4 2586.22,1598.54 2589.54,1606.56 2589.54,1615.23 2586.22,1623.25 2580.09,1629.38
  region net NetC53_2: 345.51,3141.23 386.6,3141.23 386.6,3035.07 525.07,3035.07 525.07,3183.36 345.51,3183.36
  pour cut-out: 3748.84,2894.9 3748.84,2891.58 3586.42,2891.58 3586.42,2894.9
  pour cut-out: 2994.88,1578.2 2990.92,1578.2 2990.92,1654.74 2994.88,1654.74
  pour cut-out: 2600.14,2182.11 2600.14,2188.02 2676.68,2188.02 2676.68,2182.11
Multi-Layer:
  pour cut-out: 4232.28,0 cw(c4232.28,98.43) 4133.86,98.43 cw(c4232.28,98.43) 4232.28,196.85 cw(c4232.28,98.43) 4330.71,98.43 cw(c4232.28,98.43)
  pour cut-out: 98.42,0 cw(c98.42,98.43) 0,98.43 cw(c98.42,98.43) 98.42,196.85 cw(c98.42,98.43) 196.85,98.43 cw(c98.42,98.43)
  pour cut-out: 98.42,4527.56 cw(c98.42,4625.99) 0,4625.99 cw(c98.42,4625.99) 98.42,4724.41 cw(c98.42,4625.99) 196.85,4625.99 cw(c98.42,4625.99)
  pour cut-out: 4232.28,4527.56 cw(c4232.28,4625.99) 4133.86,4625.99 cw(c4232.28,4625.99) 4232.28,4724.41 cw(c4232.28,4625.99) 4330.71,4625.99 cw(c4232.28,4625.99)
  pour cut-out: 196.85,3602.36 cw(c196.85,3740.16) 59.05,3740.16 cw(c196.85,3740.16) 196.85,3877.95 cw(c196.85,3740.16) 334.64,3740.16 cw(c196.85,3740.16)
  pour cut-out: 196.85,846.46 cw(c196.85,984.25) 59.05,984.25 cw(c196.85,984.25) 196.85,1122.05 cw(c196.85,984.25) 334.64,984.25 cw(c196.85,984.25)
  pour cut-out: 4133.86,846.46 cw(c4133.86,984.25) 3996.06,984.25 cw(c4133.86,984.25) 4133.86,1122.05 cw(c4133.86,984.25) 4271.65,984.25 cw(c4133.86,984.25)
  pour cut-out: 4133.86,3602.36 cw(c4133.86,3740.16) 3996.06,3740.16 cw(c4133.86,3740.16) 4133.86,3877.95 cw(c4133.86,3740.16) 4271.65,3740.16 cw(c4133.86,3740.16)

## Silkscreen, mask and mechanical layers (free items; w line width, h text height)
Top Overlay:
  drawing of 76 lines, arcs and shapes, not listed
  text "GNSS" at 3394.29,4608.82 h100
  text "MAIN" at 2690,4607.67 h100
  text "DIV" at 4282.33,4191.32 h100 r90
  text "5" at 1021.54,3898.89 h70
  text "4" at 1353.72,3566.36 h70
  text "5" at 1102.94,3297.01 h70
  text "4" at 1971.69,3156.09 h70
  text "VDD-SDIO" at 3981.5,2929.75 h50
  text "VDD-USIM" at 3986.5,2860.19 h50
  text "EPHY-TXP" at 2978.53,2437.5 h50
  text "EPHY-TXN" at 2977.1,2368.4 h50
  text "EPHY-RXP" at 2977.54,2300.9 h50
  text "EPHY-RXN" at 2976.11,2230.9 h50
  text "EPHY-SPD" at 2978.53,2160.9 h50
  text "EPHY-LNK" at 2975.81,2090.9 h50
  text "OFP_MSM_V1.6.2" at 745.51,2010.01 h50
  text "PWR-CTL2" at 3272.43,1999 h50
  text "PWR-CTL1" at 3272.43,1930.23 h50
  text "RGB LCD" at 430,1929.13 h100 r90
  text "PWR-CTL0" at 3272.43,1861.46 h50
  text "SMB-DAT" at 3272.43,1792.7 h50
  text "SMB-CLK" at 3272.43,1723.93 h50
  text "3" at 2392.63,1717.39 h70
  text "SMB-USZ" at 3272.43,1656.93 h50
  text "SD CARD" at 3617.03,1575 h100
  text "3" at 3413.5,1458.59 h70
  text "PWR" at 594.48,903.82 h100
  text "GSM" at 1106.29,903.82 h100
  text "HOME" at 2136.18,754.18 h100 r90
  text "NEXT" at 2569.24,754.18 h100 r90
  text "BACK" at 3000.66,752.61 h100 r90
  text "ENTER" at 3435.39,736.74 h100 r90
  text "MES" at 594.48,510.12 h100
  text "NET" at 1106.29,510.12 h100
  text "RESET" at 3606.72,310 h100
Bottom Overlay:
  drawing of 38 lines, arcs and shapes, not listed
  text "STATUS" at 2713.1,3917.68 h60 r270
  text "3V8" at 1119.57,3323.8 h60 r270
  text "3V0" at 1198.31,3323.8 h60 r270
  text "1V8" at 1277.05,3323.8 h60 r270
  text "1V2" at 1355.79,3323.8 h60 r270
  text "1" at 2937.63,1832.23 h70
  text "USM EXT" at 3440.62,1753.09 h100
  text "DEBUG" at 1295.34,1626.94 h100
  text "1" at 3330.98,1575.61 h70
  text "OFP_MSM_V1.6.2" at 3205.18,516.37 h50
Dimension:
  circle w0.5: c4232.28,98.43 r66.93
Board Outline:
  lines w10: 0,0 0,4724.41 4330.71,4724.41 4330.71,0 0,0 ; 1618.93,161.42 ccw(c1629.13,161.42) 1629.13,151.22 3402.36,151.22 ccw(c3402.36,161.42) 3412.56,161.42 3412.56,225.59 ccw(c3402.36,225.59) 3402.36,235.79 3227.88,235.79 cw(c3227.88,244.82) 3218.85,244.82 3218.85,312.99 ccw(c3208.66,312.99) 3208.66,323.19 2447.01,323.19 cw(c2447.01,332.85) 2437.36,332.85 2437.36,529.53 ccw(c2427.16,529.53) 2427.16,539.73 1852.36,539.73 ccw(c1852.36,529.53) 1842.16,529.53 1842.16,244.9 cw(c1833.05,244.9) 1833.05,235.79 1629.13,235.79 ccw(c1629.13,225.59) 1618.93,225.59 1618.93,161.42 ; 3177.17,3484.25 3397.64,3484.25 3397.64,3759.84 3177.17,3759.84 3177.17,3484.25
Fabrication:
  drawing of 295 lines, arcs and shapes, not listed
  text "Layer" at 7720.09,6970 h60
  text "Name" at 8130,6970 h60
  text "Material" at 9059.74,6970 h60
  text "Thickness" at 9919.51,6970 h60
  text "Constant" at 10569.35,6970 h60
  text "Board Layer Stack" at 11139.21,6970 h60
  text "Top Overlay" at 8130,6850 h60
  text "Top Solder" at 8130,6730 h60
  text "Solder Resist" at 9059.74,6730 h60
  text "0.010mm" at 9919.51,6730 h60
  text "3.5" at 10569.35,6730 h60
  text "1" at 7720.09,6610 h60
  text "Top Layer" at 8130,6610 h60
  text "0.035mm" at 9919.51,6610 h60
  text "Dielectric 2" at 8130,6490 h60
  text "PP-006" at 9059.74,6490 h60
  text "0.203mm" at 9919.51,6490 h60
  text "4.4" at 10569.35,6490 h60
  text "2" at 7720.09,6370 h60
  text "Layer 1" at 8130,6370 h60
  text "CF-004" at 9059.74,6370 h60
  text "0.035mm" at 9919.51,6370 h60
  text "Dielectric 1" at 8130,6250 h60
  text "FR-4" at 9059.74,6250 h60
  text "1.030mm" at 9919.51,6250 h60
  text "4.6" at 10569.35,6250 h60
  text "3" at 7720.09,6130 h60
  text "Layer 2" at 8130,6130 h60
  text "CF-004" at 9059.74,6130 h60
  text "0.035mm" at 9919.51,6130 h60
  text "Dielectric 3" at 8130,6010 h60
  text "PP-006" at 9059.74,6010 h60
  text "0.203mm" at 9919.51,6010 h60
  text "4.4" at 10569.35,6010 h60
  text "4" at 7720.09,5890 h60
  text "Bottom Layer" at 8130,5890 h60
  text "0.035mm" at 9919.51,5890 h60
  text "Bottom Solder" at 8130,5770 h60
  text "Solder Resist" at 9059.74,5770 h60
  text "0.010mm" at 9919.51,5770 h60
  text "3.5" at 10569.35,5770 h60
  text "Bottom Overlay" at 8130,5650 h60
  text "Total board thickness:" at 7720.09,5530 h60
  text "1.596mm" at 9919.51,5530 h60
Drill Drawing:
  circle w10: c108.49,6633.33 r33.33
  lines w10: 75.15,5916.67 141.82,5916.67 108.49,5850 75.15,5916.67 ; 75.15,6016.67 91.82,6016.67 108.49,6000 125.15,6016.67 141.82,6016.67 125.15,6033.33 141.82,6050 125.15,6050 108.49,6066.67 91.82,6050 75.15,6050 91.82,6033.33 75.15,6016.67 ; 75.15,6150 141.82,6150 141.82,6216.67 75.15,6216.67 75.15,6150 ; 75.15,6300 141.82,6300 141.82,6366.67 75.15,6366.67 75.15,6300 ; 75.15,6450 75.15,6466.67 91.82,6483.33 75.15,6500 75.15,6516.67 91.82,6516.67 108.49,6500 125.15,6516.67 141.82,6516.67 141.82,6500 125.15,6483.33 141.82,6466.67 141.82,6450 125.15,6450 108.49,6466.67 91.82,6450 75.15,6450 ; 75.15,6750 108.49,6766.67 141.82,6750 125.15,6783.33 141.82,6816.67 108.49,6800 75.15,6816.67 91.82,6783.33 75.15,6750 ; 75.15,6916.67 91.82,6916.67 91.82,6900 125.15,6900 125.15,6916.67 141.82,6916.67 141.82,6950 125.15,6950 125.15,6966.67 91.82,6966.67 91.82,6950 75.15,6950 75.15,6916.67 ; 75.15,7083.33 108.49,7050 141.82,7083.33 108.49,7116.67 75.15,7083.33 ; 88.49,6313.33 128.49,6313.33 128.49,6353.33 88.49,6353.33 88.49,6313.33
  lines w15: 15.36,5805 7405.34,5805 ; 15.36,7155 7405.34,7155 ; 566.24,5655 566.24,7305 ; 1166.08,5655 1166.08,7305 ; 2315.74,5655 2315.74,7305 ; 2821.62,5655 2821.62,7305 ; 3555.42,5655 3555.42,7305 ; 5054.97,5655 5054.97,7305 ; 5644.82,5655 5644.82,7305 ; 6390.62,5655 6390.62,7305 ; 15.36,5655 7405.34,5655 7405.34,7305 15.36,7305 15.36,5655
  text "Symbol" at 105.36,7200 h72
  text "Count" at 611.24,7200 h72
  text "Hole Size" at 1211.08,7200 h72
  text "Plated" at 2360.74,7200 h72
  text "Hole Type" at 2866.62,7200 h72
  text "Drill Layer Pair" at 3600.42,7200 h72
  text "Via/Pad" at 5099.97,7200 h72
  text "Pad Shape" at 5689.82,7200 h72
  text "Template" at 6435.62,7200 h72
  text "2" at 611.24,7050 h60
  text "19.69mil (0.500mm)" at 1211.08,7050 h60
  text "PTH" at 2360.74,7050 h60
  text "Slot" at 2866.62,7050 h60
  text "Top Layer - Bottom Layer" at 3600.42,7050 h60
  text "Pad" at 5099.97,7050 h60
  text "Rounded" at 5689.82,7050 h60
  text "(Mixed)" at 6435.62,7050 h60
  text "2" at 611.24,6900 h60
  text "23.62mil (0.600mm)" at 1211.08,6900 h60
  text "PTH" at 2360.74,6900 h60
  text "Rectangle" at 2866.62,6900 h60
  text "Top Layer - Bottom Layer" at 3600.42,6900 h60
  text "Pad" at 5099.97,6900 h60
  text "Rectangle" at 5689.82,6900 h60
  text "r120_220h60_140" at 6435.62,6900 h60
  text "4" at 611.24,6750 h60
  text "118.11mil (3.000mm)" at 1211.08,6750 h60
  text "PTH" at 2360.74,6750 h60
  text "Round" at 2866.62,6750 h60
  text "Top Layer - Bottom Layer" at 3600.42,6750 h60
  text "Pad" at 5099.97,6750 h60
  text "Rounded" at 5689.82,6750 h60
  text "c0h300" at 6435.62,6750 h60
  text "4" at 611.24,6600 h60
  text "157.48mil (4.000mm)" at 1211.08,6600 h60
  text "PTH" at 2360.74,6600 h60
  text "Round" at 2866.62,6600 h60
  text "Top Layer - Bottom Layer" at 3600.42,6600 h60
  text "Pad" at 5099.97,6600 h60
  text "Rounded" at 5689.82,6600 h60
  text "c600h400" at 6435.62,6600 h60
  text "5" at 611.24,6450 h60
  text "19.69mil (0.500mm)" at 1211.08,6450 h60
  text "PTH" at 2360.74,6450 h60
  text "Round" at 2866.62,6450 h60
  text "Top Layer - Bottom Layer" at 3600.42,6450 h60
  text "Pad" at 5099.97,6450 h60
  text "Rounded" at 5689.82,6450 h60
  text "(Mixed)" at 6435.62,6450 h60
  text "7" at 611.24,6300 h60
  text "43.31mil (1.100mm)" at 1211.08,6300 h60
  text "PTH" at 2360.74,6300 h60
  text "Round" at 2866.62,6300 h60
  text "Top Layer - Bottom Layer" at 3600.42,6300 h60
  text "Pad" at 5099.97,6300 h60
  text "(Mixed)" at 5689.82,6300 h60
  text "(Mixed)" at 6435.62,6300 h60
  text "8" at 611.24,6150 h60
  text "35.43mil (0.900mm)" at 1211.08,6150 h60
  text "PTH" at 2360.74,6150 h60
  text "Round" at 2866.62,6150 h60
  text "Top Layer - Bottom Layer" at 3600.42,6150 h60
  text "Pad" at 5099.97,6150 h60
  text "(Mixed)" at 5689.82,6150 h60
  text "(Mixed)" at 6435.62,6150 h60
  text "8" at 611.24,6000 h60
  text "39.37mil (1.000mm)" at 1211.08,6000 h60
  text "PTH" at 2360.74,6000 h60
  text "Round" at 2866.62,6000 h60
  text "Top Layer - Bottom Layer" at 3600.42,6000 h60
  text "Pad" at 5099.97,6000 h60
  text "(Mixed)" at 5689.82,6000 h60
  text "(Mixed)" at 6435.62,6000 h60
  text "554" at 611.24,5850 h60
  text "11.81mil (0.300mm)" at 1211.08,5850 h60
  text "PTH" at 2360.74,5850 h60
  text "Round" at 2866.62,5850 h60
  text "Top Layer - Bottom Layer" at 3600.42,5850 h60
  text "Via" at 5099.97,5850 h60
  text "Rounded" at 5689.82,5850 h60
  text "v60h30m0mx0" at 6435.62,5850 h60
  text "594 Total" at 611.24,5700 h60
  text "Slot definitions :" at 105.36,5555.03 h60
  text "Routed Path Length" at 1138.05,5555.03 h60
  text "= Calculated from tool start centre position to tool end centre position." at 2240.72,5555.03 h60
  text "Hole Length" at 1138.05,5455.05 h60
  text "= Routed Path Length + Tool Size = Slot length as defined in the PCB layout" at 1830.85,5455.05 h60

## Dimensions
4330.71,4724.41 to 4330.71,0 on Dimension
0,4724.41 to 4330.71,4724.41 on Dimension

## Text inside footprints (layer, text, board x,y; h text height)
J4: Top Overlay "1" at 103.63,2003.72 h39.37 r90
LS1: Top Overlay "+" at 3828.44,917.68 h39.37 r180